# Altium PCB flight_controller.PcbDoc (part 2 of 2)
Units mm, origin at the board's own origin, x right, y up, seen from the top; angles counter-clockwise.
Board outline 59.18 x 59.23 mm, 4 copper layers (L1 (SIG), L2 (GND), L3 (PWR), L4 (SIG)), stack 1.586 mm thick; 122 components, 85 nets, 425 pads, 276 vias.
Unrouted connection lines stored in the file: 18.
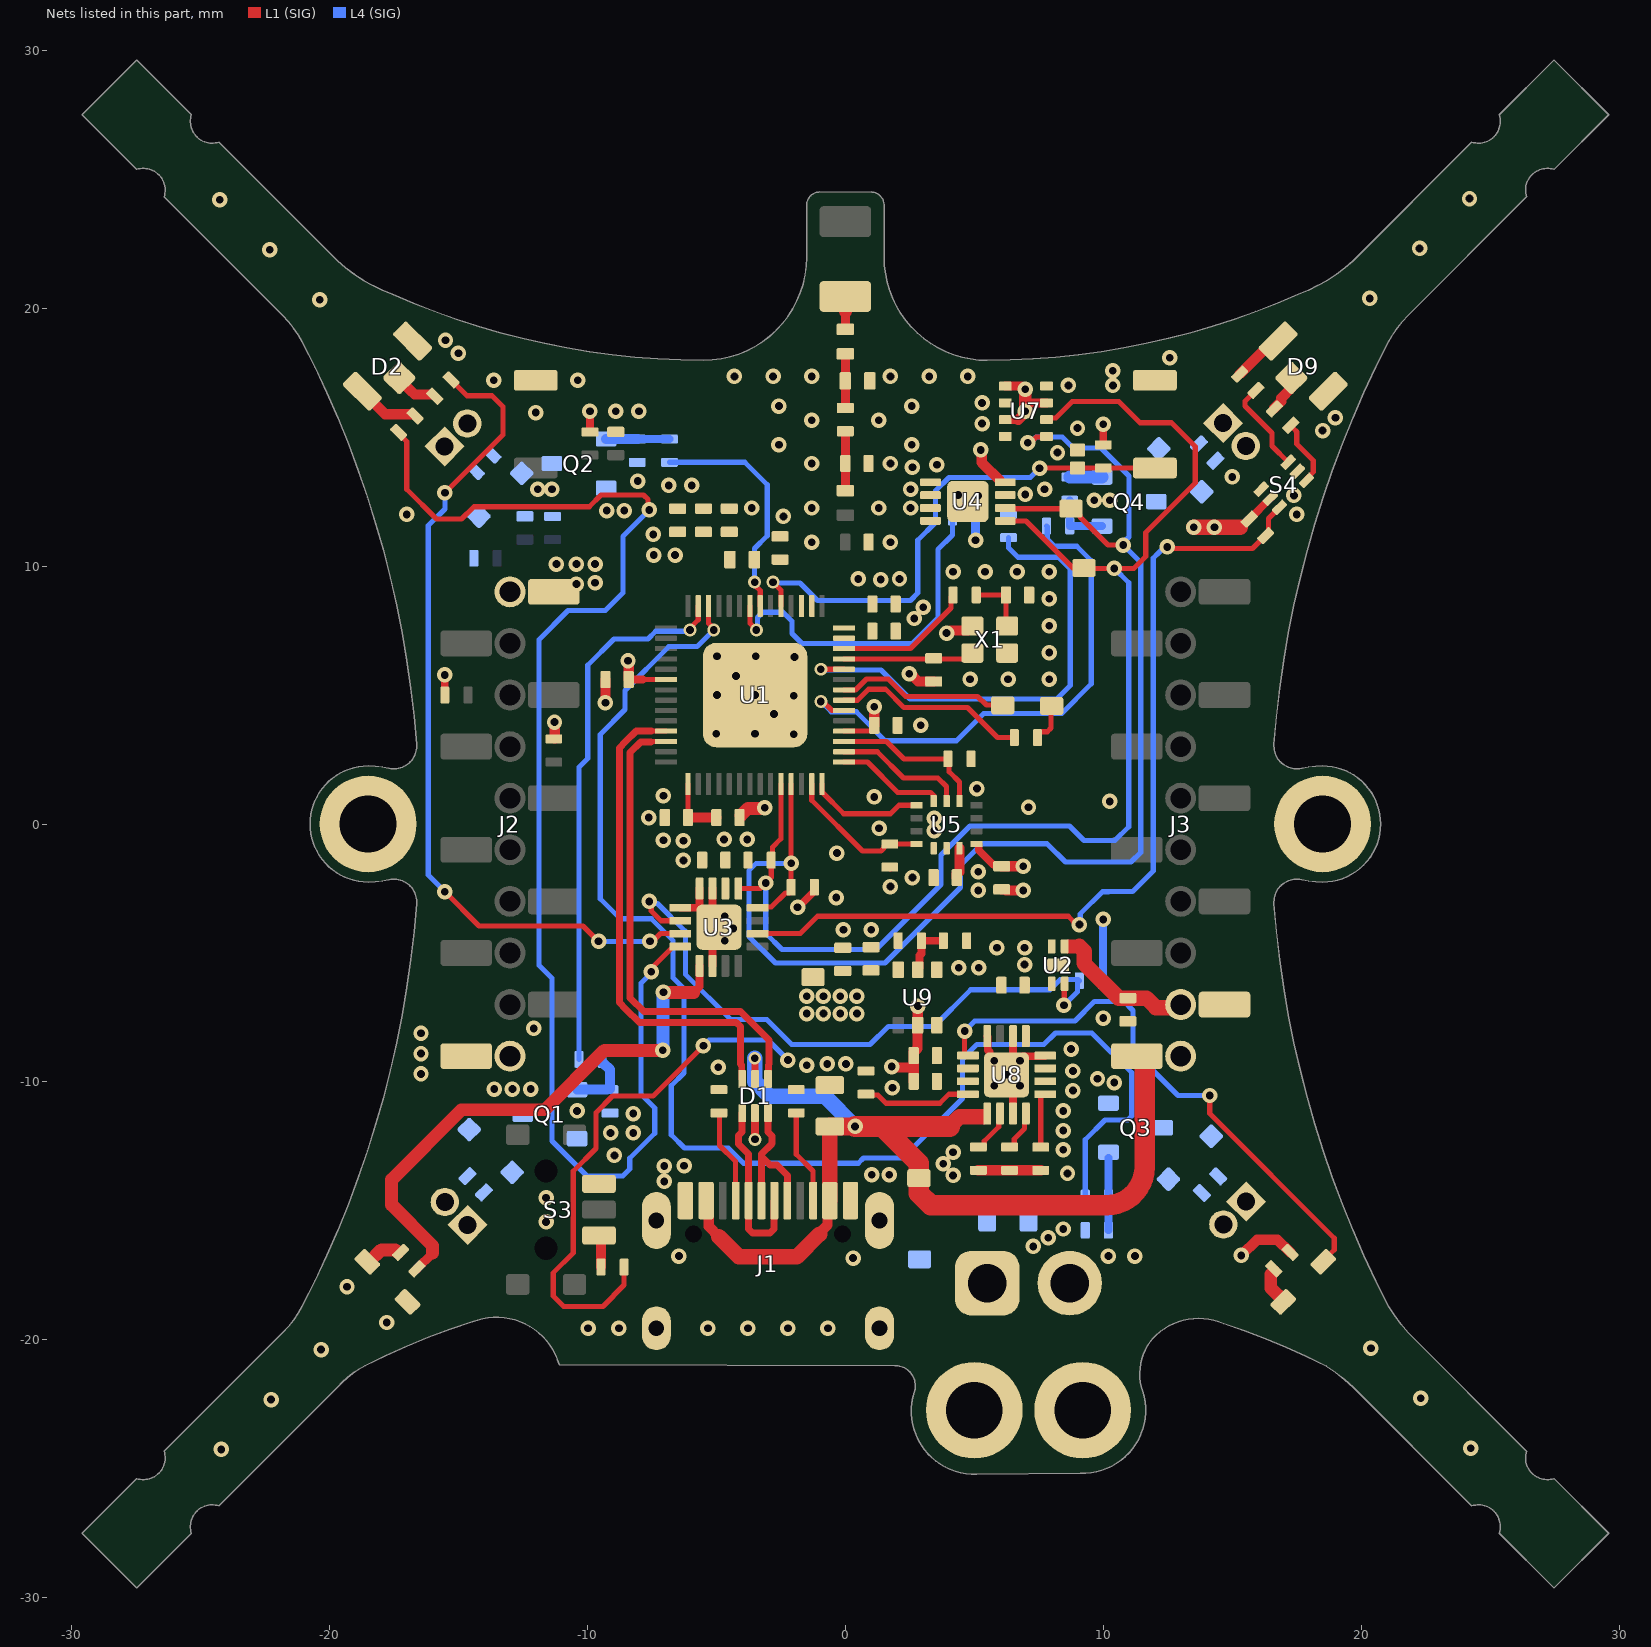
[diagram p4: the nets of this part, all layers, seen from the top]

## Via types
v1: diameter 0.6, hole 0.3, L1 (SIG) to L4 (SIG), tented both sides, 252 vias
v2: diameter 0.5/0.5/0.5/0.5 (per signal layer), hole 0.3, L1 (SIG) to L4 (SIG), tented both sides, 15 vias
v3: diameter 0.6/0.6/0.6/0.6 (per signal layer), hole 0.3, L1 (SIG) to L4 (SIG), tented both sides, 7 vias
v4: diameter 0.5, hole 0.3, L1 (SIG) to L4 (SIG), tented both sides, 2 vias

## Nets (pads, with @x,y where several pads share a name; then routed paths per layer and width w, separated by ;. In a path a pad name is that pad's centre, name@x,y a point inside that pad or via, vN(x,y) a via of type N, cw(c..) or ccw(c..) an arc to the next point about the centre after c; other vN are vias at no path point) (continued)
GND: C2.1 C3.1 C4.1 C5.1 C6.2 C7.2 C8.1 C9.1 C10.1 C11.1 C12.1 C13.1 C14.1 C15.1 C16.1 C17.1 C18.1 C19.1 C20.1 C25.1 C26.1 C29.1 C30.1 C31.1 C32.1 C33.1 C34.1 D1.2 D3.1 D4.1 H1.1 H2.1 H3.1 H4.1 J1.A1-B12 J1.B1-A12 J1.SHD J2.10 J4.2 L3.1 Q1.2 Q2.2 Q3.2 Q4.2 R4.1 R5.1 R14.2 R18.1 R23.1 R24.1 R25.1 R26.1 R28.1 R31.2 R32.2 R33.2 R34.2 R35.2 S1.2 S2.2 S3.1 S4.2 S4.4 U1.57 U2.2 U2.5 U3.1 U3.6 U3.15 U3.16 U3.17 U4.1 U4.2 U4.3 U4.4 U4.7 U4.9 U5.6 U5.7 U7.1 U7.5 U7.7 U8.4 U8.6 U8.8 U8.15 U8.17 U9.2 U9.4 X1.2 X1.4 | length 24
  L1 (SIG) w0.2: v1(-4.925,-9.425) v1@-4.912,-9.437
  L1 (SIG) w0.3: U3.1@-6.4,-3.25 -5.687,-3.25 U3.17@-5.169,-3.769 ; U3.17@-5.65,-3.213 U3.16@-5.65,-2.5 ; U3.6@-5.15,-5.5 -5.15,-4.25 U3.17@-4.9,-4 ; U3.17@-5.15,-3.75 U3.15@-5.15,-2.5 ; v4(-3.5,-12.225) D1.2@-3.5,-11.21 ; U8.8@5.5,-8.225 5.525,-8.25 5.525,-8.763 5.587,-8.824 5.587,-9.051 5.71,-9.175 v1(5.775,-9.175) ; v1(6.25,-9.725) 6.5,-9.975 U8.15@6.5,-11.225 ; U8.17@6.5,-9.051 U8.6@6.5,-8.225 ; U8.17@6.874,-9 U8.4@7.725,-9
  L1 (SIG) w0.4: v1(-9.3,4.7) C13.1@-9.3,5.6 ; v1(1.8,-9.402) 1.838,-9.44 2.615,-9.44 2.65,-9.475 ; v1(2.475,5.825) 2.529,5.825 2.829,5.525 C7.2@3.425,5.525 ; C29.1@2.65,-9.975 2.65,-9.475 ; C30.1@2.65,-8.975 2.65,-9.475 ; C30.1@2.65,-8.845 2.8,-8.695 U9.2@2.8,-7.8 2.808,-7.792 2.808,-7.067 v1(2.816,-7.058) ; v1(3.925,7.4) 3.979,7.4 4.079,7.5 4.75,7.5 X1.2@4.925,7.675 ; C25.1@4.325,-2.075 4.325,-1.945 4.425,-1.845 U5.7@4.425,-0.938 ; R32.2@5.158,-13.425 R33.2@6.367,-13.425 R34.2@7.575,-13.425 ; C26.1@6.062,-2.535 6.192,-2.535 6.233,-2.575 v1(6.9,-2.575)
  L1 (SIG) w0.5: C4.1@-4.044,0.336 -3.774,0.606 -3.144,0.606 v1(-3.125,0.625)
  L4 (SIG) w0.15: v1(-3.5,3.5) v1@-3.487,3.5 ; v1@-2.012,4.975 v1(-2,4.975)
  L4 (SIG) w0.5: R24.1@8.7,13.45 Q4.2@9.95,13.45
  other v1: -24.196,-24.246 24.246,-24.196 -22.261,-22.311 22.311,-22.261 -20.325,-20.375 20.375,-20.325 -9.975,-19.548 -8.775,-19.548 -5.325,-19.548 -3.775,-19.548 -2.225,-19.548 -0.675,-19.548 -17.775,-19.325 -19.319,-17.936 0.3,-16.825 -6.45,-16.75 10.2,-16.75 11.225,-16.75 7.281,-16.375 7.865,-16.037 8.45,-15.7 -11.6,-15.425 -11.6,-14.49 -7.025,-13.856 4.175,-13.625 1.025,-13.6 1.7,-13.6 8.612,-13.545 -7.016,-13.259 -6.25,-13.25 3.8,-13.175 -8.95,-12.85 4.175,-12.725 -9.1,-11.975 -8.225,-11.975 -8.225,-11.225 -10.4,-11.125 -13.607,-10.275 -12.903,-10.275 -12.2,-10.275 1.825,-10.225 5.775,-10.15 6.775,-10.15 10.425,-10.025 9.775,-9.875 -16.45,-9.687 -1.5,-9.35 -0.7,-9.3 0.025,-9.3 6.775,-9.175 -16.45,-8.9 8.75,-8.725 -16.45,-8.113 -12.075,-7.925 10,-7.525 4.4,-5.575 5.175,-5.575 6.95,-5.45 5.875,-4.8 6.95,-4.8 -4.675,-4.525 -0.075,-4.1 1,-4.1 -4.35,-4.05 -4.675,-3.575 -0.35,-2.85 5.15,-2.575 5.15,-1.85 -6.275,-1.413 -0.325,-1.125 -6.275,-0.65 -7.05,-0.625 3.444,-0.254 1.309,-0.165 3.444,0.225 -7.625,0.25 7.1,0.65 10.25,0.875 1.125,1.05 -7.05,1.1 5.1,1.375 -2,3.475 -5,3.5 2.925,3.825 -2.763,4.263 -4.975,5 -3.5,5 4.834,5.616 6.309,5.616 7.9,5.616 -4.237,5.737 -1.975,6.475 -4.975,6.5 -3.475,6.5 7.9,6.644 7.9,7.687 2.667,7.966 3.025,8.4 7.9,8.731 0.5,9.5 4.175,9.775 5.417,9.775 6.658,9.775 7.9,9.775 -1.3,10.925 1.75,10.925 -2.4,11.925 -17,12 17.5,12 -9.25,12.15 -8.575,12.15 -3.625,12.25 -1.3,12.25 1.3,12.25 2.528,12.25 9.652,12.55 10.252,12.55 5.15,12.725 4.375,12.75 17.39,12.739 6.979,12.775 -11.925,12.975 -11.375,12.975 2.528,12.976 7.725,12.975 -6.85,13.125 -5.95,13.125 -8.047,13.296 15,13.456 2.6,13.825 3.55,13.925 -1.3,13.975 1.75,13.975 8.225,14.4 -2.575,14.7 2.575,14.7 9,15.35 5.3,15.525 -1.3,15.65 1.3,15.65 -12,15.95 -8.9,16 -8,16 -2.575,16.2 2.575,16.2 5.3,16.325 8.65,17 10.375,17 -13.625,17.2 -10.375,17.2 -4.3,17.35 -2.8,17.35 -1.3,17.35 1.75,17.35 3.25,17.35 4.75,17.35 10.371,17.572 12.575,18.075 -20.375,20.325 20.325,20.375 -22.311,22.261 22.261,22.311 -24.246,24.196 24.196,24.246
GPIO0: D4.2 R16.1 S1.1 U1.5 | length 20.2
  L1 (SIG) w0.2: v2(-2.8,9.375) -2.5,9.075 U1.5@-2.5,8.45 ; v3(7.531,13.795) 7.534,13.797 8.997,13.797 D4.2@9,13.8 R16.1@10,13.8 S1.1@12,13.8
  L4 (SIG) w0.2: v2(-2.8,9.375) -2.772,9.347 -1.763,9.347 -1.083,8.667 2.524,8.667 2.81,8.953 2.81,11 3.5,11.69 3.5,12.919 4.017,13.436 7.172,13.436 v3(7.531,13.795)
GPIO3: R3.1 U1.8 | length 13.9
  L1 (SIG) w0.2: U1.8@-3.7,8.45 -3.7,7.781 -3.45,7.531 v2(-3.45,7.525)
  L4 (SIG) w0.2: v2(-3.45,7.525) -3.4,7.575 -3.4,8 -3.188,8.212 -2.415,8.212 -2.063,7.859 -2.063,7.381 -1.682,7 2.6,7 3.586,7.986 3.586,10.636 4.15,11.2 R3.1@4.15,11.9
GPIO46: R14.1 U1.52 | length 18.9
  L1 (SIG) w0.2: v2(-0.95,6) U1.52@-0.05,6
  L4 (SIG) w0.2: v2(-0.95,6) -0.921,5.971 1.378,5.971 2.503,4.845 8.195,4.845 8.72,5.37 8.72,9.879 8.257,10.342 6.69,10.342 6.325,10.708 R14.1@6.325,11.1
IMU_CS: R28.2 U1.45 U5.12 | length 6.1
  L1 (SIG) w0.2: U1.45@-0.05,3.2 1.601,3.2 2.276,2.525 R28.2@3.975,2.525 4.025,2.475 4.025,2.025 4.425,1.625 U5.12@4.425,0.888
IMU_INT1: R27.1 U1.41 U5.4 | length 5.7
  L1 (SIG) w0.2: U1.41@-1.3,1.55 -1.3,0.917 0.662,-1.045 1.383,-1.045 1.5,-0.928 1.5,-0.85 1.575,-0.775 U5.4@2.762,-0.775
IMU_MISO: U1.42 U5.1 | length 4.5
  L1 (SIG) w0.2: U1.42@-0.9,1.55 -0.9,1.225 -0.884,1.225 -0.059,0.4 1.75,0.4 2.075,0.725 U5.1@2.762,0.725
IMU_MOSI: U1.43 U5.14 | length 4.2
  L1 (SIG) w0.2: U1.43@-0.05,2.4 0.858,2.4 2.033,1.225 3.308,1.225 3.425,1.108 U5.14@3.425,0.888
IMU_SCK: U1.44 U5.13 | length 5.1
  L1 (SIG) w0.2: U1.44@-0.05,2.8 1.24,2.8 2.251,1.789 3.586,1.789 3.925,1.45 U5.13@3.925,0.888
INT_SCL: Designator12.1 R8.1 U1.39 U3.12 U4.6 U7.4 | length 54.2
  L1 (SIG) w0.2: U3.12@-3.4,-3.25 -3.361,-3.211 -2.861,-3.211 -2.325,-2.675 -2.175,-2.675 -2.1,-2.6 R8.1@-2.1,-2.45 v1(-2.1,-1.525) U1.39@-2.1,1.55 ; U4.6@6.2,12.25 6.23,12.22 Designator12.1@8.745,12.22 ; v3(7.075,14.783) 7.183,14.783 7.401,15 7.775,15 U7.4@7.8,15.025 ; Designator12.1@8.75,12.25 8.825,12.25 9.1,11.975 9.1,11.9 10.187,10.813 v1(10.773,10.813)
  L4 (SIG) w0.2: v1(-2.1,-1.525) -3.455,-1.525 -3.741,-1.811 -3.741,-4.359 -2.708,-5.392 1.533,-5.392 4.46,-2.465 4.46,-1.599 5.295,-0.764 7.82,-0.764 8.535,-1.479 11.07,-1.479 11.449,-1.099 11.449,10.136 v1(10.773,10.813) 10.773,10.911 10.992,11.13 10.992,13.495 9.912,14.575 8.833,14.575 8.408,15 7.392,15 7.192,14.8 v3@7.075,14.8
INT_SDA: Designator13.1 R7.1 U1.38 U3.13 U4.5 U7.3 | length 52.9
  L1 (SIG) w0.2: U3.13@-4.15,-2.5 -3.3,-2.5 v1(-3.088,-2.288) -2.875,-2.075 R7.1@-2.875,-1.4 ; R7.1@-2.825,-1.234 -2.825,-0.9 -2.5,-0.575 U1.38@-2.5,1.55 ; U4.5@6.2,11.75 7.006,11.75 8.848,9.907 v1(10.429,9.907) 11.182,9.907 11.647,10.372 11.647,11.298 13.565,13.216 13.565,14.633 12.644,15.554 11.421,15.554 10.6,16.375 8.797,16.375 8.16,15.738 7.863,15.738 U7.3@7.8,15.675
  L4 (SIG) w0.2: v1@-3.075,-2.3 v1(-3.088,-2.288) -3.088,-4.237 -2.458,-4.867 1.183,-4.867 3.71,-2.34 3.71,-1.199 4.831,-0.078 8.691,-0.078 9.255,-0.642 10.447,-0.642 10.986,-0.104 10.986,9.351 v1(10.429,9.907)
LED_BLUE_L: R9.2 U3.5 | length 21.5
  L1 (SIG) w0.3: -5.875,-6.525 -5.65,-6.3 U3.5@-5.65,-5.5
  L1 (SIG) w0.35: R9.2@-16.607,-17.243 -16,-16.636
  L1 (SIG) w0.5: -16,-16.636 -16,-16.35 -17.587,-14.763 -17.587,-13.787 -14.878,-11.078 -11.644,-11.078 -9.342,-8.775 v1(-7.075,-8.775) ; v1(-7.05,-6.525) -5.875,-6.525
  L4 (SIG) w0.5: v1(-7.075,-8.775) -7.063,-8.762 -7.063,-6.547 v1@-7.067,-6.542
LED_GREEN_L: R10.1 U3.3 | length 32.8
  L1 (SIG) w0.2: v1(-15.525,-2.625) -14.2,-3.95 -10.167,-3.95 v1(-9.567,-4.55) ; v1(-15.523,12.843) -13.275,15.091 -13.275,16.175 -13.7,16.6 -14.664,16.6 R10.1@-15.282,17.218 ; v1(-7.575,-4.55) -7.467,-4.55 -7.167,-4.25 U3.3@-6.4,-4.25
  L4 (SIG) w0.2: v1(-15.525,-2.625) -16.171,-1.979 -16.171,11.568 -15.523,12.215 v1(-15.523,12.843) ; v1(-9.567,-4.55) v1(-7.575,-4.55)
LED_GREEN_RED_R: R40.2 S4.6 U3.10 | length 35
  L1 (SIG) w0.2: U3.10@-3.4,-4.25 -1.75,-4.25 -1.075,-3.575 8.642,-3.575 8.967,-3.9 v1(9.075,-3.9) ; v1(12.484,10.74) 12.549,10.675 15.786,10.675 R40.2@16.293,11.182 16.399,11.288 16.399,11.842 S4.6@16.83,12.273
  L4 (SIG) w0.2: v1(9.075,-3.9) 9.106,-3.869 9.106,-3.483 9.964,-2.625 10.2,-2.625 10.213,-2.612 11.138,-2.612 11.934,-1.816 11.934,10.3 12.075,10.442 12.078,10.442 12.376,10.74 v1(12.484,10.74)
LED_RED_L: R11.1 U3.4 | length 54.1
  L1 (SIG) w0.2: R11.1@-17.318,15.182 -17.318,15.147 -17,14.829 -17,12.975 -15.85,11.825 -14.875,11.825 -14.4,12.3 -9.929,12.3 -9.471,12.758 -7.823,12.758 -7.644,12.579 -7.644,12.219 v3(-7.6,12.175) ; v1(-7.525,-5.725) -7.448,-5.648 -7.448,-5.523 -6.675,-4.75 U3.4@-6.4,-4.75
  L4 (SIG) w0.2: v3(-7.6,12.175) -8.625,11.15 -8.625,8.957 -9.307,8.275 -10.75,8.275 -11.88,7.145 -11.88,-5.475 -11.376,-5.98 -11.376,-12.285 -10.015,-13.645 -8.631,-13.645 -8.355,-13.37 -8.355,-12.955 -7.387,-11.987 -7.387,-11.013 -7.925,-10.475 -7.925,-6.174 -7.525,-5.774 v1(-7.525,-5.725)
"Motor L-Down": R19.2 U1.13 | length 21
  L1 (SIG) w0.2: v2(-6.025,7.525) -6.025,7.592 -5.7,7.917 U1.13@-5.7,8.45
  L4 (SIG) w0.2: R19.2@-10.325,-9.125 -10.325,2.199 -9.985,2.539 -9.985,6.155 -8.97,7.17 -7.655,7.17 -7.35,7.475 -6.075,7.475 v2(-6.025,7.525)
"Motor L-Up": R20.2 U1.7 | length 9.1
  L1 (SIG) w0.2: v2(-3.517,9.375) -3.517,9.267 -3.3,9.05 U1.7@-3.3,8.45
  L4 (SIG) w0.2: R20.2@-6.819,14.025 -3.902,14.025 -3.029,13.152 -3.029,11.171 -3.517,10.683 v2(-3.517,9.375)
"Motor R-Down": R21.2 U1.12 | length 53.4
  L1 (SIG) w0.2: U1.12@-5.3,8.45 -5.3,7.781 -5.1,7.581 v2(-5.1,7.525)
  L4 (SIG) w0.2: v2(-5.1,7.525) -5.75,6.875 -6.844,6.875 -8.542,5.177 -8.542,4.433 -9.5,3.475 -9.5,-2.9 -8.725,-3.675 -7.525,-3.675 -6.675,-4.525 -6.675,-5.965 -6.25,-6.39 -6.25,-9.65 -6.75,-10.15 -6.75,-12.05 -6.238,-12.562 -4.537,-12.562 -3.95,-13.15 0.5,-13.15 0.7,-12.95 2.225,-12.95 4.538,-10.637 4.538,-9.112 5.098,-8.552 7.695,-8.552 8.15,-8.097 9.555,-8.097 11.1,-9.642 11.1,-11.325 10.95,-11.475 10.065,-11.475 9.3,-12.24 R21.2@9.3,-14.5
"Motor R-Up": R22.2 U1.48 | length 20.4
  L1 (SIG) w0.2: v2(-0.95,4.75) -0.872,4.75 -0.522,4.4 U1.48@-0.05,4.4
  L4 (SIG) w0.2: v2(-0.95,4.75) -0.55,4.35 0.42,4.35 1.541,3.229 4.306,3.229 5.366,4.288 8.388,4.288 9.533,5.433 9.533,10.204 8.971,10.766 8.109,10.766 7.825,11.05 7.825,11.525 R22.2@7.8,11.55
NetANT1_1: ANT1.1 L1.2 | length 1.3
  L1 (SIG) w0.35: L1.2@0,19.175 ANT1.1@0,19.875
  L1 (SIG) w0.5: ANT1.1@0,19.875 ANT1.1@0,20.45
NetC1_1: C1.1 C2.2 L2.1 | length 2.3
  L1 (SIG) w0.35: L2.1@0,12.925 C2.2@0,13.975 C1.1@0,15.225
NetC1_2: C1.2 L1.1 L3.2 | length 2.1
  L1 (SIG) w0.35: C1.2@0,16.125 L3.2@0,17.175 L1.1@0,18.225
NetC4_2: C4.2 C5.2 U1.29 | length 2.4
  L1 (SIG) w0.2: C5.2@-6.1,0.25 U1.29@-6.1,1.55
  L1 (SIG) w0.4: C5.2@-6.1,0.25 C4.2@-5,0.25
NetC6_1: C6.1 R6.1 X1.1 | length 2.4
  L1 (SIG) w0.2: R6.1@5.075,8.875 C6.1@6.225,8.875 6.225,7.725 X1.1@6.275,7.675
NetC11_2: C11.2 L4.2 U1.2 U1.3
NetC21_1: C21.1 D5.2 J5.2 Q1.3
NetC22_1: C22.1 D6.2 J6.2 Q2.3
NetC23_1: C23.1 D7.2 J7.2 Q3.3
NetC24_1: C24.1 D8.2 J8.2 Q4.3
NetD2_2: D2.2 R10.2 | length 1.5
  L1 (SIG) w0.4: D2.2@-17.29,17.29 -17.29,17.24 -16.849,16.799 -16.703,16.653 R10.2@-16.059,16.653
NetD2_3: D2.3 R11.2 | length 2.3
  L1 (SIG) w0.4: D2.3@-18.722,16.778 -17.833,15.889 R11.2@-16.788,15.889
NetD3_2: D3.2 R9.1 | length 1.4
  L1 (SIG) w0.5: D3.2@-18.517,-16.983 -18.462,-16.983 -17.986,-16.507 -17.449,-16.507 R9.1@-17.349,-16.607
NetD9_2: D9.2 R38.2 | length 1.4
  L1 (SIG) w0.4: R38.2@16.632,16.121 16.893,16.383 16.893,16.504 17.29,16.901 D9.2@17.29,17.29
NetD9_3: D9.3 R39.2 | length 2
  L1 (SIG) w0.4: R39.2@15.282,17.443 16.561,18.722 D9.3@16.778,18.722
NetD10_2: D10.2 R37.1 | length 1.4
  L1 (SIG) w0.5: R37.1@16.607,-17.349 16.491,-17.465 16.491,-17.986 16.972,-18.467 D10.2@16.972,-18.528
NetJ1_A5: J1.A5 R4.2 | length 3.7
  L1 (SIG) w0.2: R4.2@-4.9,-11.2 -4.875,-11.225 -4.875,-12.458 -4.264,-13.069 -4.264,-14.586 J1.A5@-4.25,-14.6
NetJ1_B5: J1.B5 R5.2 | length 3.7
  L1 (SIG) w0.2: R5.2@-1.9,-11.2 -1.9,-12.8 -1.25,-13.45 J1.B5@-1.25,-14.6
NetQ1_1: Q1.1 R19.1 R23.2 | length 2.3
  L4 (SIG) w0.4: Q1.1@-10.394,-10.294 R23.2@-9.25,-10.294 ; R19.1@-9.4,-9.25 -9.12,-9.53 R23.2@-9.12,-10.275
NetQ2_1: Q2.1 R20.1 R25.2 | length 2.5
  L4 (SIG) w0.3: R25.2@-8.069,14.922 R20.1@-6.819,14.922
  L4 (SIG) w0.4: Q2.1@-9.275,14.925 -9.273,14.923 R25.2@-8.069,14.922 R25.2@-8.069,14.922
NetQ3_1: Q3.1 R21.1 R26.2 | length 2.8
  L4 (SIG) w0.3: R26.2@10.2,-15.75 R21.1@10.2,-14.5 Q3.1@10.2,-12.95
NetQ4_1: Q4.1 R22.1 R24.2 | length 2.3
  L4 (SIG) w0.3: R24.2@8.7,12.55 R22.1@8.7,11.55 Q4.1@9.95,11.55
NetR13_1: R13.1 U1.49 | length 7.5
  L1 (SIG) w0.2: U1.49@-0.05,4.8 0.475,4.8 0.9,5.225 1.563,5.225 2.268,4.52 4.732,4.52 5.898,3.353 R13.1@6.547,3.353
NetR30_2: R30.2 R35.1 U9.5 | length 2
  L1 (SIG) w0.3: U9.5@2.8,-5.65 2.875,-5.575 2.875,-5.1 2.95,-5.025 R30.2@2.95,-4.525 R35.1@3.8,-4.525
NetR31_1: R31.1 U8.12 | length 4.1
  L1 (SIG) w0.2: R31.1@0.95,-10.475 0.987,-10.512 1.262,-10.512 1.575,-10.825 3.662,-10.825 4.012,-10.475 U8.12@4.75,-10.475
NetR32_1: R32.1 U8.14 | length 1.7
  L1 (SIG) w0.2: R32.1@5.158,-12.525 5.308,-12.525 5.383,-12.45 5.383,-12.3 5.95,-11.733 5.95,-11.275 U8.14@6,-11.225
NetR33_1: R33.1 U8.16 | length 1.6
  L1 (SIG) w0.2: R33.1@6.367,-12.525 6.475,-12.525 6.55,-12.45 6.55,-12.21 6.95,-11.811 6.95,-11.275 U8.16@7,-11.225
NetR34_1: R34.1 U8.1 | length 2.2
  L1 (SIG) w0.2: R34.1@7.575,-12.525 7.575,-10.525 7.625,-10.475 U8.1@7.75,-10.475
NetR36_1: R36.1 S3.3 | length 1.3
  L1 (SIG) w0.4: S3.3@-9.55,-15.95 -9.475,-16.025 R36.1@-9.475,-17.175
NetR38_1: R38.1 S4.1 | length 2.6
  L1 (SIG) w0.2: R38.1@17.268,15.457 17.268,15.431 17.477,15.222 17.477,15.215 17.5,15.192 17.5,14.734 18.137,14.097 18.137,13.64 17.877,13.379 S4.1@17.877,13.32
NetR39_1: R39.1 S4.3 | length 3.6
  L1 (SIG) w0.2: R39.1@15.918,16.807 15.497,16.386 15.497,16.201 16.537,15.16 16.537,14.659 S4.3@17.17,14.027
PM_CHG: D10.1 U8.9 | length 22.1
  L1 (SIG) w0.2: v1(4.625,-8.025) 4.625,-8.925 4.675,-8.975 U8.9@4.75,-8.975 ; v1(14.125,-10.525) 14.125,-11.226 18.955,-16.056 18.955,-16.505 18.528,-16.932 D10.1@18.528,-16.972
  L4 (SIG) w0.2: v1(4.625,-8.025) 5.019,-7.631 8.902,-7.631 9.659,-6.875 10.8,-6.875 11.15,-7.225 11.15,-8.78 12.895,-10.525 v1(14.125,-10.525)
RX: Designator8.1 U1.50 | length 6.8
  L1 (SIG) w0.2: U1.50@-0.05,5.2 0.39,5.2 0.815,5.625 1.663,5.625 2.342,4.946 5.129,4.946 5.467,4.608 6.092,4.608 Designator8.1@6.1,4.6
TX: Designator7.1 R13.2 | length 1.6
  L1 (SIG) w0.2: R13.2@7.45,3.35 7.45,3.5 7.525,3.575 7.825,3.575 7.975,3.725 7.975,4.55 Designator7.1@8,4.575
USB_D_IN_N: D1.1 J1.A7 J1.B7 | length 6.9
  L1 (SIG) w0.27: D1.1@-4,-11.21 -4,-11.94 -4.142,-12.082 -4.142,-12.408 -3.75,-12.8 J1.B7@-3.75,-14.6 -3.75,-15.698 -3.598,-15.85 -2.925,-15.85 -2.772,-15.697 -2.772,-14.622 J1.A7@-2.75,-14.6
USB_D_IN_P: D1.3 J1.A6 J1.B6 | length 6
  L1 (SIG) w0.27: J1.A6@-3.25,-14.6 -3.25,-12.8 ; D1.3@-2.999,-11.211 -2.999,-11.942 -2.845,-12.096 -2.845,-12.394 -3.25,-12.8 ; J1.B6@-2.25,-14.6 -2.25,-13.625 -2.65,-13.225 -2.925,-13.225 -3.25,-12.9 -3.25,-12.8
USB_D_N: D1.6 U1.25 | length 19.1
  L1 (SIG) w0.2: -7.515,3.6 U1.25@-6.95,3.6
  L1 (SIG) w0.27: -7.515,3.6 -8.105,3.6 -8.514,3.191 -8.76,2.945 -8.76,-6.919 -8.514,-7.165 -7.985,-7.695 -4.23,-7.695 -4.072,-7.853 -4.072,-9.312 -4.015,-9.369 -4.015,-9.875 D1.6@-4,-9.89
USB_D_P: D1.4 U1.26 | length 18.7
  L1 (SIG) w0.2: -7.525,3.18 -7.505,3.2 U1.26@-6.95,3.2
  L1 (SIG) w0.27: -7.525,3.18 -7.931,3.18 -8.34,2.771 -8.34,-6.745 -7.811,-7.275 -4.056,-7.275 -3.603,-7.727 -2.952,-8.379 -2.952,-9.312 -2.985,-9.345 -2.985,-9.675 -3,-9.69 D1.4@-3,-9.89
VBAT: C21.2 C22.2 C23.2 C24.2 C34.2 D5.1 D6.1 D7.1 D8.1 Designator10.1 J4.1 J5.1 J6.1 J7.1 J8.1 R15.2 U8.2 U8.3
  other v1: 8.45,-12.625 8.45,-11.883 8.45,-11.125 8.825,-10.333 8.825,-9.575
VCOM: C16.2 C29.2 C30.2 R36.2 U2.3 U8.5 U8.10 U8.11 U9.3 | length 20.7
  L1 (SIG) w0.2: R36.2@-8.575,-17.175 -8.575,-17.875 -9.4,-18.7 -10.917,-18.7 -11.325,-18.292 -11.325,-17.4 -10.55,-16.625 -10.55,-13.464 -9.668,-12.581 -9.668,-11.193 -9.025,-10.55 -7.45,-10.55 v1(-5.5,-8.6)
  L4 (SIG) w0.2: v1(-5.5,-8.6) -5.275,-8.375 -3,-8.375 v1(-2.225,-9.15)
VCOM_EXP: C17.2 J3.9 U2.1 | length 5.6
  L1 (SIG) w0.55: 8.666,-4.745 9.07,-4.745
  L1 (SIG) w0.6: 9.07,-4.745 9.254,-4.929 9.254,-5.405 10.599,-6.75 11.675,-6.75 12.04,-7.115 12.885,-7.115 J3.9@13,-7
VCOM_EXP_EN: R12.1 U2.4 U3.2 | length 24.7
  L1 (SIG) w0.2: v1(-7.6,-3) -7.523,-3.077 -7.523,-3.368 -7.142,-3.75 U3.2@-6.4,-3.75 ; v1(8.475,-7.025) 8.487,-7.013 8.487,-6.207 U2.4@8.5,-6.195
  L4 (SIG) w0.2: v1(-7.6,-3) -7.523,-3.077 -7.285,-3.077 -6.203,-4.159 -6.203,-5.827 -4.445,-7.584 -3.046,-7.584 -2.08,-8.551 0.961,-8.551 1.668,-7.844 2.844,-7.844 2.85,-7.85 3.438,-7.85 4.862,-6.425 7.931,-6.425 8.331,-6.025 9.025,-6.025 R12.1@9.075,-6.075 9,-6.15 9,-6.5 v1(8.475,-7.025)
VDD_3v3: C8.2 C9.2 C10.2 C12.2 C13.2 C14.2 C15.2 C18.2 C25.2 C26.2 C31.2 C32.2 D2.1 D9.1 Designator11.1 J2.1 L4.1 R1.2 R2.2 R3.2 R7.2 R8.2 R12.2 R16.2 R17.2 R27.2 R30.1 R37.2 R40.1 S4.5 U1.20 U1.46 U1.55 U1.56 U3.14 U4.8 U5.5 U5.8 U7.2 U7.6 U7.8 U9.6 | length 24.4
  L1 (SIG) w0.2: R1.2@-11.3,3.3 R1.2@-11.27,3.33 ; v1(-11.275,3.95) v1@-11.27,3.945 ; -7.85,5.6 U1.20@-6.95,5.6 ; U1.46@-0.05,3.6 1.025,3.6 1.125,3.7 C12.2@1.125,3.775
  L1 (SIG) w0.3: R2.2@-15.525,5 v1(-15.525,5.78) ; R17.2@-9.9,15.2 v1(-9.9,16) ; C13.2@-8.4,5.6 -7.85,5.6 ; v1(-1.85,-3.225) -1.825,-3.225 -1.225,-2.625 -1.225,-2.475 R8.2@-1.2,-2.45 ; R27.2@1.725,-1.675 R27.2@1.737,-1.688 ; v1@1.737,-2.412 v1(1.75,-2.425) ; U5.8@5.174,-0.8 5.174,-1.022 5.737,-1.585 6.012,-1.585 C26.2@6.062,-1.635 ; R16.2@10,14.7 v1(10,15.5) ; 15.302,11.499 15.621,11.818 R40.1@15.657,11.818 ; R40.1@15.668,11.818 S4.5@16.477,12.627
  L1 (SIG) w0.35: U7.8@6.2,16.975 v1@6.85,16.975 ; U7.6@6.201,15.676 6.705,15.676 ; 7.075,16.325 U7.2@7.8,16.325
  L1 (SIG) w0.4: R1.2@-11.27,3.33 v1@-11.27,3.945 ; v1(-8.425,6.325) -8.4,6.3 C13.2@-8.4,5.6 ; C12.2@1.125,3.825 v1(1.125,4.55) ; v1(5.25,14.5) 5.288,14.462 5.288,14.012 U4.8@6,13.3 ; C26.2@6.062,-1.635 v1(6.9,-1.635) ; 6.705,15.676 6.975,15.946 v1(6.975,16) ; 6.975,16.425 7.075,16.325 ; v1(15.35,-16.725) 15.962,-16.113 16.75,-16.113 R37.2@17.243,-16.607
  L1 (SIG) w0.5: v1(6.975,16) 6.975,16.425 v1(6.975,16.85)
  L1 (SIG) w0.6: v1(13.51,11.499) v1(14.31,11.499) 15.302,11.499
  L4 (SIG) w0.3: R12.2@9.975,-6.075 9.988,-6.062 9.988,-3.712 v1(10,-3.7)
  L4 (SIG) w0.35: v1(5.05,11) R3.2@5.05,11.9
  other v1: -1.5,-7.35 -0.85,-7.35 -0.2,-7.35 0.45,-7.35 -1.5,-6.675 -0.85,-6.675 -0.2,-6.675 0.45,-6.675 2.6,-2.075 -4.7,-0.6 -3.8,-0.6 -10.425,9.3 -9.7,9.35 1.375,9.475 2.1,9.5 -11.2,10.075 -10.425,10.075 -9.7,10.075 -7.425,10.425 -6.6,10.425 -7.45,11.225 18.5,15.25 19,15.75 -15,18.25 -15.5,18.75
VUSB: C33.2 D1.5 Designator9.1 J1.A4-B9 J1.B4-A9 J3.10 U8.13 | length 40.6
  L1 (SIG) w0.26: v4(-3.512,-9.08) -3.506,-9.086 -3.506,-9.884 D1.5@-3.5,-9.89
  L1 (SIG) w0.4: J1.A4-B9@-5.4,-14.6 -5.3,-14.7 -5.3,-15.6 -4.9,-16 ; -1,-15.9 -1,-15.849 -0.69,-15.539 -0.69,-14.69 J1.B4-A9@-0.6,-14.6
  L1 (SIG) w0.6: -4.9,-16 -4.125,-16.775 -1.875,-16.775 -1,-15.9 ; J1.B4-A9@-0.6,-14.6 C33.2@-0.6,-11.725 ; 4.051,-11.725 4.426,-11.35 U8.13@5.35,-11.35
  L1 (SIG) w0.7: C33.2@-0.6,-11.725 v1(0.375,-11.725)
  L1 (SIG) w0.8: v1(0.375,-11.725) 1.429,-11.725 ; 2.45,-11.725 2.6,-11.725 ; 4.051,-11.725 2.6,-11.725 ; J3.10@11.3,-9 11.5,-9 11.6,-9.1 11.6,-13.306 cw(c10.125,-13.306) 10.125,-14.781 3.319,-14.781 2.85,-14.312 Designator9.1@2.85,-13.729 2.85,-13.146 1.429,-11.725 ; 1.429,-11.725 2.6,-11.725
  L4 (SIG) w0.6: v4(-3.512,-9.08) -3.512,-9.988 -2.945,-10.555 -0.795,-10.555 v1(0.375,-11.725)
XTAL_N: C7.1 U1.53 X1.3 | length 5.1
  L1 (SIG) w0.2: U1.53@-0.05,6.4 3.425,6.4 4.7,6.4 X1.3@4.925,6.625
XTAL_P: R6.2 U1.54 | length 5.3
  L1 (SIG) w0.2: U1.54@-0.05,6.8 2.525,6.8 4.1,8.375 4.1,8.8 R6.2@4.175,8.875
pads on no net: ANT1.2 J1.17 J1.18 J1.A8 J1.B8 S3.MH1 S3.MH2 S3.MP1 S3.MP2 S3.MP3 S3.MP4 U1.28 U1.30 U1.31 U1.32 U1.33 U1.34 U1.35 U1.36 U1.37 U1.51 U3.7 U3.8 U3.9 U3.11 U5.2 U5.3 U5.9 U5.10 U5.11 U8.7

## Polygon pours and split planes (outlines as drawn)
GND on L1 (SIG) "GND_L01_P070" (solid, pour order 70): -0.8,7.925 -0.8,10.26 -0.8,18.138 -3.756,18.138 -3.914,17.98 -5.503,17.976 cw(c-5.503,17.974) -5.502,17.973 cw(c-5.439,47.887) -17.56,20.539 cw(c-15.333,26.588) -19.691,21.838 -24.287,26.434 cw(c-24.545,27.237) -25.348,27.495 -27.469,29.616 -29.591,27.495 -27.469,25.374 cw(c-27.211,24.571) -26.409,24.313 -21.812,19.717 cw(c-25.397,16.268) -21.047,18.681 cw(c-57.073,0.018) -16.617,3.099 cw(c-17.501,3.027) -17.692,2.161 ccw(c-18.505,-1.487) -18.5,2.25 ccw(c-18.5,0) -20.75,0 ccw(c-18.5,0) -18.5,-2.25 ccw(c-18.508,1.513) -17.692,-2.161 cw(c-17.502,-3.027) -16.617,-3.099 cw(c-57.074,-0.018) -21.047,-18.681 cw(c-24.464,-16.957) -21.812,-19.717 -26.409,-24.313 cw(c-27.211,-24.571) -27.469,-25.374 -29.591,-27.495 -27.469,-29.616 -25.348,-27.495 cw(c-24.545,-27.237) -24.287,-26.434 -19.691,-21.838 cw(c-16.887,-24.319) -18.64,-21.011 cw(c-5.902,-46.156) -14.464,-19.3 cw(c-13.529,-21.656) -11.093,-20.956 -11.092,-20.955 1.908,-20.996 cw(c1.932,-21.775) 2.669,-22.027 ccw(c5,-22.761) 5.1,-25.202 9.1,-25.166 ccw(c9.2,-22.725) 11.531,-21.992 cw(c13.511,-21.306) 11.921,-19.94 cw(c13.702,-21.606) 14.662,-19.364 cw(c5.91,-46.136) 18.64,-21.011 cw(c14.96,-26.769) 19.691,-21.838 24.287,-26.434 cw(c24.545,-27.237) 25.348,-27.495 27.469,-29.616 29.591,-27.495 27.469,-25.374 cw(c27.211,-24.571) 26.409,-24.313 21.812,-19.717 cw(c27.09,-15.017) 21.047,-18.681 cw(c57.081,-0.016) 16.617,-3.099 cw(c17.502,-3.027) 17.692,-2.161 ccw(c18.508,1.515) 18.5,-2.25 ccw(c18.5,0) 20.75,0 ccw(c18.5,0) 18.5,2.25 ccw(c18.506,-1.491) 17.692,2.161 cw(c17.502,3.027) 16.617,3.099 cw(c57.081,0.016) 21.047,18.681 cw(c25.41,16.258) 21.812,19.717 26.409,24.313 cw(c27.211,24.571) 27.469,25.374 29.591,27.495 27.469,29.616 25.348,27.495 cw(c24.545,27.237) 24.287,26.434 19.691,21.838 cw(c15.335,26.585) 17.56,20.539 17.56,20.538 cw(c5.44,47.886) 6.951,18.011 3.859,18.002 3.724,18.138 -0.8,18.138
VDD_3v3 on L1 (SIG) "VDD_3V3_L01_P027" (solid, pour order 27): 17.965,16.558 17.961,16.558 17.961,16.477 18.428,16.01 18.428,15.603 18.168,15.342 18.168,15.112 18.348,14.932 18.685,14.932 19.349,15.595 19.349,16.871 19.522,17.044 18.986,17.579
VDD_3v3 on L1 (SIG) "VDD_3V3_L01_P028" (solid, remove dead copper, pour order 28): -17.577,19.033 -17.133,19.478 -16.985,19.478 -16.573,19.065 -15.378,19.065 -14.692,18.379 -14.692,18.075 -14.857,17.909 -15.14,17.909 -15.533,18.302 -16.126,18.302 -16.519,17.909 -17.577,18.968
VCOM on L1 (SIG) "L1 (SIG)-VCOM" (solid, pour order 37): 3.325,-7.5 3.325,-6.842 3.099,-6.616 2.043,-6.616 1.503,-7.156 1.503,-8.116 1.009,-8.61 -1.534,-8.61 -1.896,-8.972 -1.896,-9.325 -2.058,-9.487 -2.062,-9.483 -2.482,-9.483 -2.577,-9.387 -2.577,-8.814 -1.983,-8.22 0.818,-8.22 1.158,-7.879 1.158,-6.936 1.791,-6.303 3.408,-6.303 4.158,-6.875 4.45,-6.875 6.475,-6.875 6.738,-6.612 6.738,-5.937 6.775,-5.9 8.125,-5.9 8.169,-5.944 8.169,-6.55 7.15,-6.55 7.15,-8.65 6.85,-8.65 6.825,-8.625 6.825,-7.525 6.725,-7.425 4.603,-7.425 4.075,-7.953 4.075,-9.1 4.302,-9.327 5.25,-9.327 5.25,-10.15 3.964,-10.15 3.783,-10.331 3.381,-10.331 3.325,-10.275
VDD_3v3 on L1 (SIG) "NONET_L01_P028" (solid, pour order 40): 0.325,-5.9 0.325,-6.078 0.791,-6.544 0.791,-7.677 -1.911,-7.677 -1.911,-5.375 1.775,-5.375 1.775,-4.25 1.825,-4.2 2.225,-4.2 2.275,-4.25 2.275,-5.946 2.246,-5.975 1.825,-5.975 1.75,-5.9
VDD_3v3 on L1 (SIG) "VDD_3V3_L01_P034" (solid, remove dead copper, pour order 34): 0.829,8.875 1.05,9.096 1.05,9.575 1.275,9.8 2.275,9.8 2.4,9.675 2.4,9.325 2.225,9.15 1.55,9.15 1.275,8.875 1.275,7.143 0.418,7.143 0.369,7.094 -0.485,7.094 -0.485,7.706 0.276,7.706 0.822,8.252
NetC11_2 on L1 (SIG) "NETC11_2_L01_P042" (solid, pour order 42): -2.413,9.813 -2.235,9.635 -2.235,9.267 -1.82,8.893 -1.82,8.025 -1.195,8.025 -1.195,8.87 -1.65,9.325 -1.65,10.023 -2.177,10.55 -3.125,10.55 -3.261,10.686 -3.855,10.686 -3.855,9.813
VBAT on L1 (SIG) "VBAT_L01_P039" (solid, pour order 39): 9.225,-10.753 8.789,-11.189 8.789,-12.953 8.34,-12.953 8.15,-12.763 8.15,-10.994 8.475,-10.669 8.475,-10.275 8.35,-10.15 7.325,-10.15 7.325,-9.325 8.375,-9.325 8.475,-9.225 9.225,-9.225
VDD_3v3 on L1 (SIG) "VDD_3V3_L01_P069" (solid, pour order 69): 1.4,-1.5 1.4,-2.525 1.625,-2.75 2.15,-2.75 2.5,-2.4 3.65,-2.4 3.65,-1.487 3.548,-1.384 3.548,-0.713 3.306,-0.713 3.302,-0.71 3.299,-0.713 3.299,-1.351 3.15,-1.5
VDD_3v3 on L1 (SIG) "VDD_3V3_L01_P068" (solid, pour order 68): -3.6,-0.3 -4.9,-0.3 -5,-0.4 -5,-0.952 -4.863,-1.089 -4.863,-1.742 -4.812,-1.792 -4.812,-2.938 -4.493,-2.938 -4.493,-2.076 -4.135,-1.719 -3.591,-1.719 -3.5,-1.628 -3.5,-0.4
VDD_3v3 on L1 (SIG) "VDD_3V3_L01_P041" (solid, pour order 41): -9.375,8.975 -9.9,8.45 -12.175,8.45 -12.308,8.583 -12.308,9.467 -11.35,10.425 -9.525,10.425 -9.375,10.275
VDD_3v3 on L1 (SIG) "VDD_3V3_L01_P048" (solid, pour order 48): -6.197,10.227 -6.301,10.123 -7.648,10.123 -7.825,10.3 -7.825,11.337 -7.623,11.539 -6.764,11.539 -4.197,11.539 -4.15,11.491 -4.15,10.65 -4.238,10.562 -4.238,9.937 -4.3,9.875 -4.675,9.875 -4.725,9.925 -4.725,11.05 -4.797,11.122 -6.142,11.122 -6.197,11.068
GND on L4 (SIG) "GND_L04_P067" (solid, pour order 67): -0.8,18.138 -3.756,18.138 -3.914,17.98 -5.503,17.976 cw(c-5.503,17.974) -5.502,17.973 cw(c-5.439,47.887) -17.56,20.539 cw(c-15.333,26.588) -19.691,21.838 -24.287,26.434 cw(c-24.545,27.237) -25.348,27.495 -27.469,29.616 -29.591,27.495 -27.469,25.374 cw(c-27.211,24.571) -26.409,24.313 -21.812,19.717 cw(c-25.396,16.268) -21.047,18.681 cw(c-57.073,0.018) -16.617,3.099 cw(c-17.501,3.027) -17.692,2.161 ccw(c-18.505,-1.486) -18.5,2.25 ccw(c-18.5,0) -20.75,0 ccw(c-18.5,0) -18.5,-2.25 ccw(c-18.508,1.513) -17.692,-2.161 cw(c-17.502,-3.027) -16.617,-3.099 cw(c-57.074,-0.018) -21.047,-18.681 cw(c-24.464,-16.957) -21.812,-19.717 -26.409,-24.313 cw(c-27.211,-24.571) -27.469,-25.374 -29.591,-27.495 -27.469,-29.616 -25.348,-27.495 cw(c-24.545,-27.237) -24.287,-26.434 -19.691,-21.838 cw(c-16.887,-24.319) -18.64,-21.011 cw(c-5.902,-46.156) -14.464,-19.3 cw(c-13.529,-21.656) -11.093,-20.956 -11.092,-20.955 1.908,-20.996 cw(c1.932,-21.775) 2.669,-22.027 ccw(c5,-22.761) 5.1,-25.202 9.1,-25.166 ccw(c9.2,-22.725) 11.531,-21.992 cw(c13.511,-21.306) 11.921,-19.94 cw(c13.702,-21.606) 14.662,-19.364 cw(c5.911,-46.135) 18.64,-21.011 cw(c14.961,-26.768) 19.691,-21.838 24.287,-26.434 cw(c24.545,-27.237) 25.348,-27.495 27.469,-29.616 29.591,-27.495 27.469,-25.374 cw(c27.211,-24.571) 26.409,-24.313 21.812,-19.717 cw(c27.09,-15.017) 21.047,-18.681 cw(c57.082,-0.016) 16.617,-3.099 cw(c17.502,-3.027) 17.692,-2.161 ccw(c18.508,1.515) 18.5,-2.25 ccw(c18.5,0) 20.75,0 ccw(c18.5,0) 18.5,2.25 ccw(c18.506,-1.49) 17.692,2.161 cw(c17.502,3.027) 16.617,3.099 cw(c57.081,0.016) 21.047,18.681 cw(c25.41,16.258) 21.812,19.717 26.409,24.313 cw(c27.211,24.571) 27.469,25.374 29.591,27.495 27.469,29.616 25.348,27.495 cw(c24.545,27.237) 24.287,26.434 19.691,21.838 cw(c15.335,26.585) 17.56,20.539 17.56,20.538 cw(c5.44,47.886) 6.951,18.011 3.859,18.002 3.724,18.138
VBAT on L4 (SIG) "L4 (SIG)-VBAT" (solid, pour order 66): 12.366,13.841 13.115,13.841 14.008,14.734 14.613,14.735 15.426,15.549 14.625,16.35 13.825,15.55 13.825,15.125 13.075,14.375 12.85,14.375 12.573,14.652 12.573,14.94 14.434,16.8 15.6,16.8 16.725,15.675 16.725,14.354 15.225,12.854 15.225,11.225 14.725,10.7 14.725,-10.975 13.568,-12.132 13.568,-13.058 14.4,-13.89 14.4,-14.29 15.542,-15.433 16.35,-14.625 15.225,-13.5 14.63,-13.5 14.272,-13.142 14.265,-12.652 14.506,-12.411 16.286,-12.411 16.88,-13.005 16.88,-16.5 15.943,-17.437 11.897,-17.437 9.784,-19.55 4.3,-19.55 3.475,-18.725 3.475,-16.733 4.49,-15.775 5.15,-15.775 5.15,-15.9 4.225,-16.825 4.225,-18.75 4.55,-19.075 6.4,-19.075 6.775,-18.7 6.775,-16.8 5.875,-15.9 5.875,-15.347 8.271,-12.951 8.773,-12.951 8.773,-11.212 9.225,-10.76 9.225,-9.225 8.475,-9.225 8.475,-10.275 5.15,-13.6 5.15,-14.75 4.1,-14.75 1.412,-17.437 -11.893,-17.437 -12.425,-16.905 -12.425,-13.506 -13.01,-12.922 -14.364,-14.276 -14.364,-14.464 -15.438,-15.538 -14.651,-16.324 -13.863,-15.535 -13.97,-15.43 -13.918,-14.468 -13.18,-13.731 -13.009,-13.902 -13,-16.9 -13.275,-17.175 -15.325,-17.175 -16.55,-15.95 -16.55,-12.55 -14.096,-10.096 -14.096,11.329 -13.468,11.957 -13.468,12.666 -13.468,13.122 -14.76,14.414 -14.76,14.649 -15.536,15.425 -16.323,14.638 -15.35,13.665 -14.582,13.665 -14.209,13.292 -14.209,12.566 -15.548,11.227 -15.548,6.862 -14.925,6.239 -14.925,5 -14.94,5 -15.546,4.394 -15.551,-1.605 -14.94,-2.216 -14.94,-3.043 -15.553,-3.656 -15.558,-10.058 -17.8,-12.3 -17.8,-16.575 -15.95,-18.425 2.293,-18.425 2.7,-18.855 2.7,-19.55 3.611,-20.461 10.404,-20.461 12.365,-18.5 16.65,-18.5 17.806,-17.344 17.806,-12.381 16.075,-10.65 16.075,12.175 17.806,13.906 17.806,17.044 17.2,17.65 13.775,17.65 11.675,15.55 11.675,14.531
NetC22_1 on L4 (SIG) "NETC22_1_L04_P065" (solid, remove dead copper, pour order 65): -15.056,15.141 -14.797,14.881 -14.529,14.881 -12.745,13.098 -12.541,13.098 -11.964,13.675 -10.968,13.675 -10.968,14.278 -12.332,14.278 -12.55,14.059 -13.138,14.059 -13.667,14.588 -13.667,15.318 -14.453,16.105 -14.857,16.105 -15.265,15.696 -15.265,15.415
NetC24_1 on L4 (SIG) "NETC24_1_L04_P064" (solid, pour order 64): 15.277,15.214 15.771,15.214 16.079,14.907 16.079,14.415 15.752,14.088 14.701,14.136 14.285,13.742 14.285,12.844 13.63,12.19 11.642,12.19 11.642,12.879 13.327,12.879 13.783,13.335 13.783,13.81 14.412,14.439 14.542,14.439
NetC23_1 on L4 (SIG) "NETC23_1_L04_P063" (solid, remove dead copper, pour order 63): 11.89,-11.472 12.7,-11.472 12.7,-13.444 13.043,-13.787 13.594,-13.787 14.666,-14.859 14.771,-14.859 15.213,-15.301 15.213,-15.777 14.911,-16.079 14.413,-16.079 13.925,-15.592 13.925,-14.7 13.544,-14.319 12.563,-14.319 11.89,-13.646
NetC21_1 on L4 (SIG) "NETC21_1_L04_P046" (solid, remove dead copper, pour order 46): -14.175,-10.941 -15.09,-11.829 -14.693,-12.226 -14.693,-13.402 -14.993,-13.702 -15.355,-13.702 -16.081,-14.429 -16.081,-14.897 -15.77,-15.208 -15.287,-15.208 -14.957,-14.878 -14.957,-14.244 -14.124,-13.412 -14.124,-11.89 -13.792,-11.558 -12.086,-11.558 -12.086,-10.941
GND on L2 (GND) "L2 (GND)-GND" (solid, pour order 59): -0.8,18.138 -3.756,18.138 -3.914,17.98 -5.503,17.976 cw(c-5.503,17.974) -5.502,17.973 cw(c-5.439,47.887) -17.56,20.539 cw(c-15.333,26.588) -19.691,21.838 -24.287,26.434 cw(c-24.545,27.237) -25.348,27.495 -27.469,29.616 -29.591,27.495 -27.469,25.374 cw(c-27.211,24.571) -26.409,24.313 -21.812,19.717 cw(c-25.396,16.269) -21.047,18.681 cw(c-57.072,0.018) -16.617,3.099 cw(c-17.501,3.027) -17.692,2.161 ccw(c-18.505,-1.485) -18.5,2.25 ccw(c-18.5,0) -20.75,0 ccw(c-18.5,0) -18.5,-2.25 ccw(c-18.508,1.513) -17.692,-2.161 cw(c-17.502,-3.027) -16.617,-3.099 cw(c-57.074,-0.018) -21.047,-18.681 cw(c-24.464,-16.957) -21.812,-19.717 -26.409,-24.313 cw(c-27.211,-24.571) -27.469,-25.374 -29.591,-27.495 -27.469,-29.616 -25.348,-27.495 cw(c-24.545,-27.237) -24.287,-26.434 -19.691,-21.838 cw(c-16.887,-24.319) -18.64,-21.011 cw(c-5.902,-46.155) -14.464,-19.3 cw(c-13.529,-21.656) -11.093,-20.956 -11.092,-20.955 1.908,-20.996 cw(c1.932,-21.775) 2.669,-22.027 ccw(c5,-22.761) 5.1,-25.202 9.1,-25.166 ccw(c9.2,-22.725) 11.531,-21.992 cw(c13.511,-21.306) 11.921,-19.94 cw(c13.702,-21.606) 14.662,-19.364 cw(c5.911,-46.134) 18.64,-21.011 cw(c14.961,-26.767) 19.691,-21.838 24.287,-26.434 cw(c24.545,-27.237) 25.348,-27.495 27.469,-29.616 29.591,-27.495 27.469,-25.374 cw(c27.211,-24.571) 26.409,-24.313 21.812,-19.717 cw(c27.089,-15.017) 21.047,-18.681 cw(c57.082,-0.016) 16.617,-3.099 cw(c17.502,-3.027) 17.692,-2.161 ccw(c18.508,1.515) 18.5,-2.25 ccw(c18.5,0) 20.75,0 ccw(c18.5,0) 18.5,2.25 ccw(c18.505,-1.489) 17.692,2.161 cw(c17.502,3.027) 16.617,3.099 cw(c57.081,0.016) 21.047,18.681 cw(c25.409,16.259) 21.812,19.717 26.409,24.313 cw(c27.211,24.571) 27.469,25.374 29.591,27.495 27.469,29.616 25.348,27.495 cw(c24.545,27.237) 24.287,26.434 19.691,21.838 cw(c15.335,26.585) 17.56,20.539 17.56,20.538 cw(c5.44,47.886) 6.951,18.011 3.859,18.002 3.724,18.138
VDD_3v3 on L3 (PWR) "VDD_3V3_L03_P061" (solid, pour order 61): -0.8,18.138 -3.756,18.138 -3.914,17.98 -5.503,17.976 cw(c-5.503,17.974) -5.502,17.973 cw(c-5.439,47.887) -17.56,20.539 cw(c-15.333,26.588) -19.691,21.838 -24.287,26.434 cw(c-24.545,27.237) -25.348,27.495 -27.469,29.616 -29.591,27.495 -27.469,25.374 cw(c-27.211,24.571) -26.409,24.313 -21.812,19.717 cw(c-25.396,16.268) -21.047,18.681 cw(c-57.073,0.018) -16.617,3.099 cw(c-17.501,3.027) -17.692,2.161 ccw(c-18.505,-1.486) -18.5,2.25 ccw(c-18.5,0) -20.75,0 ccw(c-18.5,0) -18.5,-2.25 ccw(c-18.508,1.513) -17.692,-2.161 cw(c-17.502,-3.027) -16.617,-3.099 cw(c-57.074,-0.018) -21.047,-18.681 cw(c-24.464,-16.957) -21.812,-19.717 -26.409,-24.313 cw(c-27.211,-24.571) -27.469,-25.374 -29.591,-27.495 -27.469,-29.616 -25.348,-27.495 cw(c-24.545,-27.237) -24.287,-26.434 -19.691,-21.838 cw(c-16.887,-24.319) -18.64,-21.011 cw(c-5.902,-46.156) -14.464,-19.3 cw(c-13.529,-21.656) -11.093,-20.956 -11.092,-20.955 1.908,-20.996 cw(c1.932,-21.775) 2.669,-22.027 ccw(c5,-22.761) 5.1,-25.202 9.1,-25.166 ccw(c9.2,-22.725) 11.531,-21.992 cw(c13.511,-21.306) 11.921,-19.94 cw(c13.702,-21.606) 14.662,-19.364 cw(c5.911,-46.135) 18.64,-21.011 cw(c14.961,-26.768) 19.691,-21.838 24.287,-26.434 cw(c24.545,-27.237) 25.348,-27.495 27.469,-29.616 29.591,-27.495 27.469,-25.374 cw(c27.211,-24.571) 26.409,-24.313 21.812,-19.717 cw(c27.09,-15.017) 21.047,-18.681 cw(c57.082,-0.016) 16.617,-3.099 cw(c17.502,-3.027) 17.692,-2.161 ccw(c18.508,1.515) 18.5,-2.25 ccw(c18.5,0) 20.75,0 ccw(c18.5,0) 18.5,2.25 ccw(c18.506,-1.49) 17.692,2.161 cw(c17.502,3.027) 16.617,3.099 cw(c57.081,0.016) 21.047,18.681 cw(c25.41,16.258) 21.812,19.717 26.409,24.313 cw(c27.211,24.571) 27.469,25.374 29.591,27.495 27.469,29.616 25.348,27.495 cw(c24.545,27.237) 24.287,26.434 19.691,21.838 cw(c15.335,26.585) 17.56,20.539 17.56,20.538 cw(c5.44,47.886) 6.951,18.011 3.859,18.002 3.724,18.138

## Silkscreen, mask and mechanical layers (free items; w line width, h text height)
Top Overlay:
  drawing of 25 lines, arcs and shapes, not listed
  text "M1" at 18.839,19.545 h0.75 r315
  text "M4" at -19.634,18.75 h0.75 r45
  text "CosFly" at -9.287,16.475 h0.75
  text "V1" at -7.675,15.15 h0.75
  text "FRONT" at -5.374,13.425 h0.75
  text "BOOT" at 10.625,12.15 h0.75
  text "RESET" at -13.749,12 h0.75
  text "X" at -8.7,-7.854 h0.75
  text "Y" at -10.932,-10.15 h0.75
  text "Z" at -7.7,-10.15 h0.75
  text "OFF" at -15.4,-12.925 h0.75
  text "+" at 4.992,-15.512 h1.52
  text "-" at 8.192,-15.512 h1.52
  text "ON" at -15.025,-17.725 h0.75
  text "M2" at 19.634,-18.75 h0.75 r225
  text "M3" at -18.75,-19.634 h0.75 r135
Bottom Overlay:
  circle w0.15: c7.8,1.6 r0.048
  lines w0.2: -18.671,-15.68 -15.843,-12.851 ; -18.656,15.637 -15.828,12.808 ; -15.68,18.671 -12.851,15.843 ; -15.637,-18.656 -12.808,-15.828
  text "M4" at -18.75,19.634 h0.75 r45
  text "M1" at 19.545,18.838 h0.75 r315
  text "+" at 12.767,15.436 h0.75 r225
  text "-" at -12.712,14.464 h0.75 r45
  text "-" at 14.536,12.775 h0.75 r315
  text "+" at -15.373,12.695 h0.75 r315
  text "3V3" at -13.975,8.625 h0.75
  text "TX2" at 16.175,8.625 h0.75
  text "RX1" at -14.15,6.625 h0.75
  text "RX2" at 16.125,6.625 h0.75
  text "TX1" at -14.15,4.625 h0.75
  text "SCLK" at 12.125,4.625 h0.75
  text "SDA" at -14.025,2.625 h0.75
  text "MISO" at 12.062,2.625 h0.75
  text "SCL" at -14.025,0.625 h0.75
  text "MOSI" at 16.45,0.625 h0.75
  text "CS3" at -14.025,-1.375 h0.75
  text "OW" at 15.825,-1.375 h0.75
  text "IO1" at 16.012,-3.375 h0.75
  text "CS2" at -14.025,-3.625 h0.75
  text "CS1" at -14.15,-5.375 h0.75
  text "IO2" at 16.137,-5.375 h0.75
  text "CS0" at -14.025,-7.375 h0.75
  text "VCOM" at 16.5,-7.375 h0.75
  text "GND" at -14.025,-9.375 h0.75
  text "VUSB" at 16.5,-9.375 h0.75
  text "-" at -14.464,-12.712 h0.75 r135
  text "+" at 15.373,-12.695 h0.75 r135
  text "-" at 12.712,-14.464 h0.75 r225
  text "+" at -12.695,-15.373 h0.75 r45
  text "M3" at -19.634,-18.75 h0.75 r135
  text "M2" at 18.75,-19.634 h0.75 r225
Board Shape:
  the board outline again, w0.15